# Altium PCB T_B 1.PcbDoc
Units mil, origin at the board's own origin, x right, y up, seen from the top; angles counter-clockwise.
Board outline 2834.65 x 1062.99 mil, 2 copper layers (Top Layer, Bottom Layer); 34 components, 22 nets, 84 pads, 27 vias.
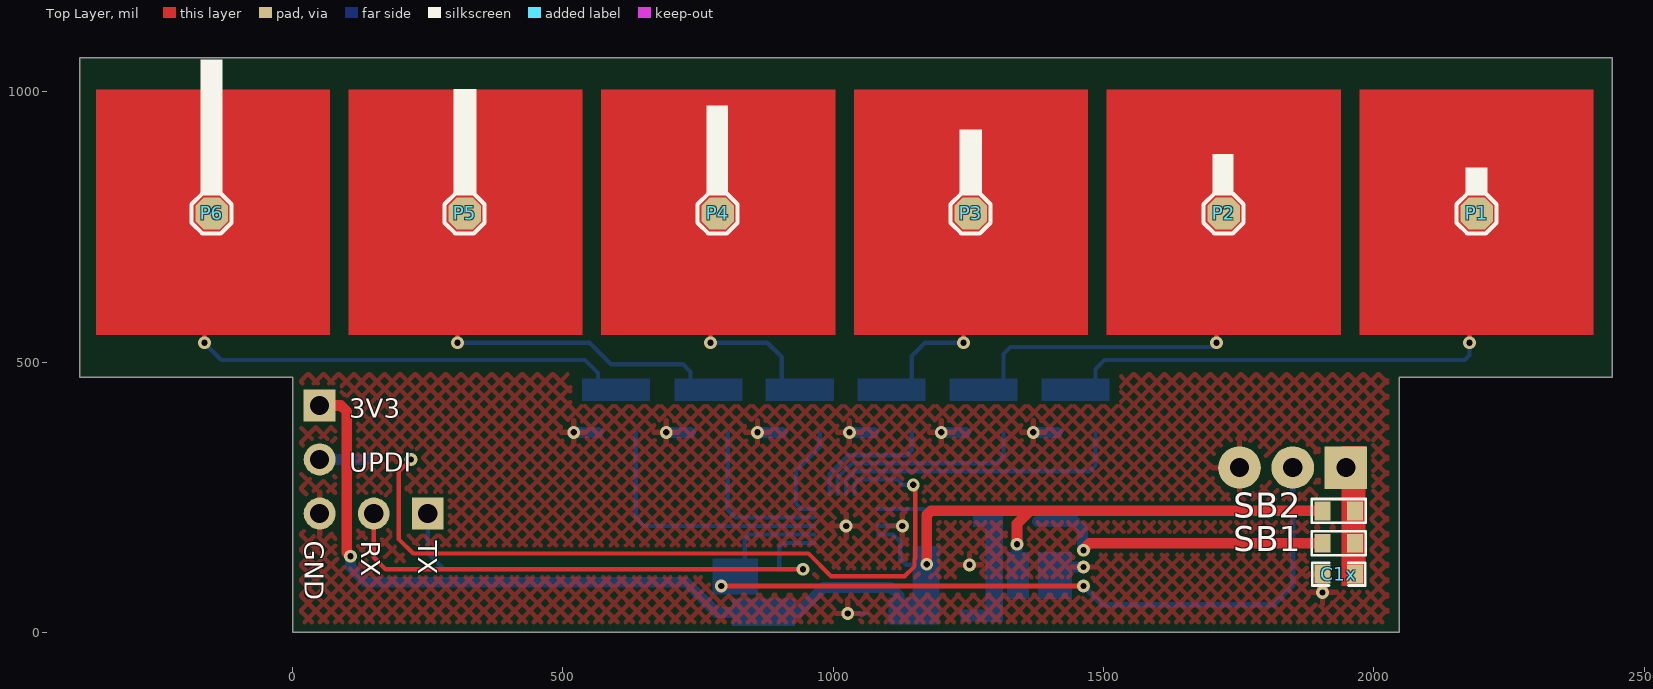
[diagram p0: Top Layer view]
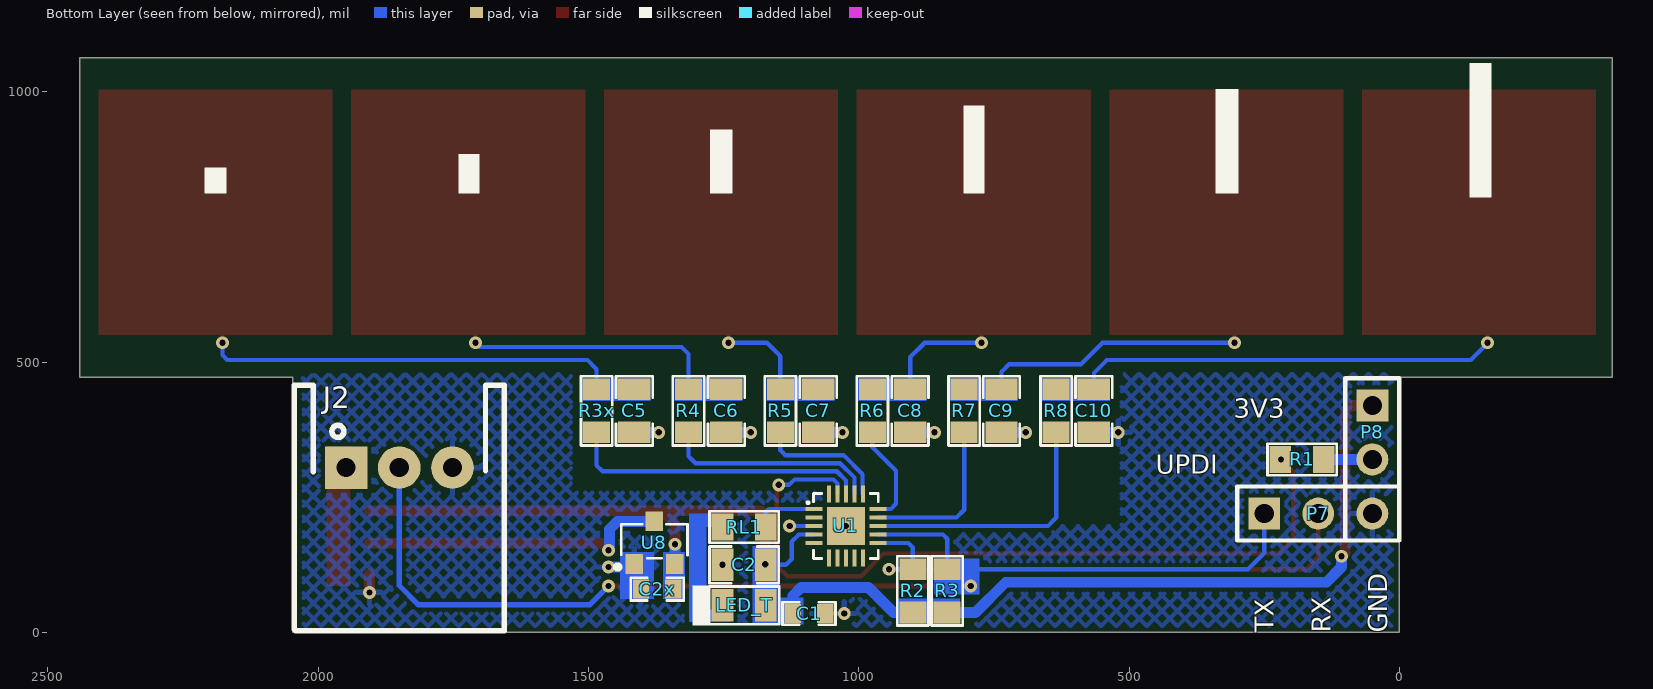
[diagram p1: Bottom Layer view, seen from below]
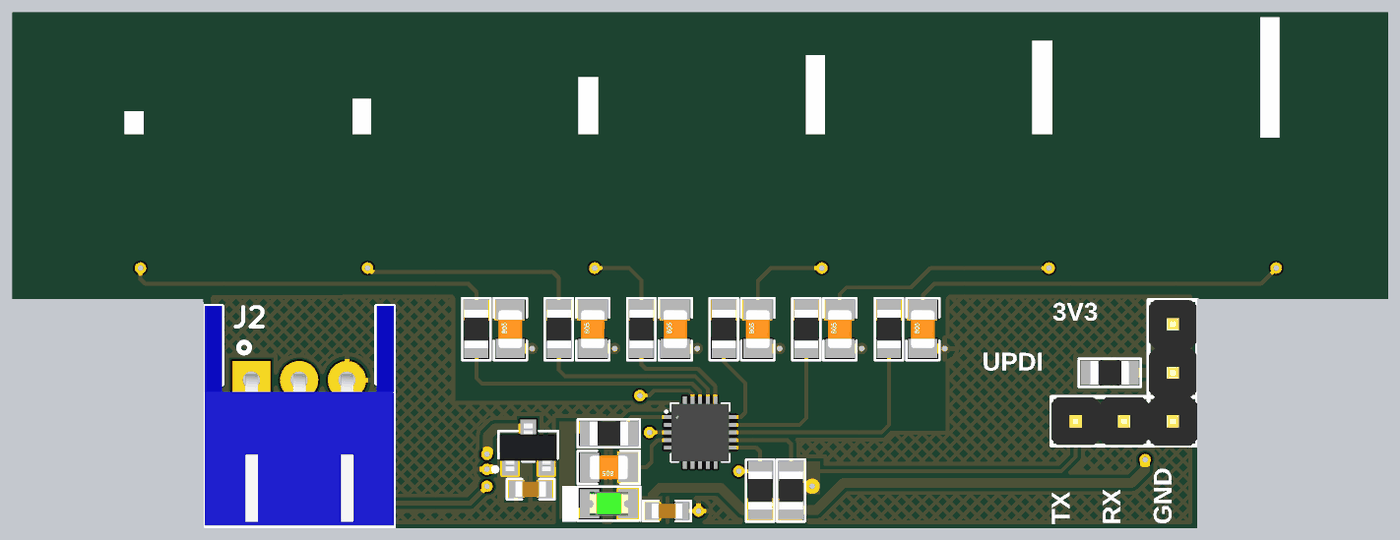
[diagram p2: 3D render of the assembled board from below, using the file's embedded part models]

## Layer stack, top to bottom
Top Solder: solder mask 0.4, Solder Resist, Dk 3.5
Top Layer: signal copper 1.4
Dielectric 1: dielectric 12.6, FR-4, Dk 4.8
Bottom Layer: signal copper 1.4
Bottom Solder: solder mask 0.4, Solder Resist, Dk 3.5

## Board outline
-393.7,472.44 0,472.44 0,0 2047.24,0 2047.24,472.44 2440.94,472.44 2440.94,1062.99 -393.7,1062.99

## Design rules (kind name [scope] priority, off if disabled: settings)
Clearance [All] p1: gap=7 ignorepadtopadclearanceinfootprint=FALSE
ComponentClearance [All] p1: gap=0 collisioncheckmode=3 verticalgap=0 showdistances=FALSE
MinimumSolderMaskSliver [All] p1: minsoldermaskwidth=0
PolygonConnect [All] p1: connectstyle=Relief reliefconductorwidth=10 reliefentries=4 polygonreliefangle="90 Angle" airgapwidth=10
RoutingVias [All] p1: holewidth=11.81 width=23.62 viastyle="Through Hole" minholewidth=11.81 minwidth=23.62 maxholewidth=11.81 maxwidth=50
SilkToSilkClearance [All] p1: silktosilkclearance=0
SilkToSolderMaskClearance [IsPad] p1: minsilkscreentomaskgap=0 clearancetoexposedcopper=TRUE
SolderMaskExpansion [All] p1: expansion=4
Width [All] p1: maxlimit=20 minlimit=8 preferedwidth=10
26 further rules are at their usual default settings.

## Classes and differential pairs
component class U_Controller_Section: C1 C2 LED_T R1 R2 R3 RL1 U1
component class U_Connector_Section: J2 P1 P2 P3 P4 P5 P6 P7 P8
component class U_Touch_Sensor_Section: C3 C5 C6 C7 C8 C9 C10 R3x R4 R5 R6 R7 R8
component class U_Power_Section: C1x C2x J1 SB1 SB2 U8

## Components (designator, comment, footprint, x,y, rotation, side; value= is the part's Value field where it differs from the comment)
C1 "1uF" Cap0603 1092,35 r180 bottom
C1x "1uF" Cap0603 1935,108 r180 top
C2 "0.1uF" Cap0805 1212,125 r0 bottom
C2x "1uF" Cap0603 1373,80 r0 bottom
C5 "22pF" Cap0805 1415,410 r90 bottom
C6 "22pF" Cap0805 1245,410 r90 bottom
C7 "22pF" Cap0805 1075,410 r90 bottom
C8 "22pF" Cap0805 905,410 r90 bottom
C9 "22pF" Cap0805 736,410 r90 bottom
C10 "22pF" Cap0805 565,410 r90 bottom
J2 "Main-Conn" S3B-XH-A-1(LF)(SN) 1948.43,305 r180 bottom locked
LED_T "150080GS75000" "LED 0805" 1212,50 r0 bottom
P1 "Test Point" "TEST POINT" 2190,775 r0 top
P2 "Test Point" "TEST POINT" 1722,775 r0 top
P3 "Test Point" "TEST POINT" 1254,775 r0 top
P4 "Test Point" "TEST POINT" 786,775 r0 top
P5 "Test Point" "TEST POINT" 318,775 r0 top
P6 "Test Point" "TEST POINT" -150,775 r0 top
P7 "Testing" HDR1X3#1 250,220 r180 bottom locked
P8 "Programming" HDR1X3#2 50,420 r270 bottom
R1 "5.6K" "RES 0805" 180,320 r180 bottom
R2 "5.6K" "RES 0805" 900,77 r270 bottom
R3 "5.6K" "RES 0805" 836.5,77 r270 bottom
R3x "1K" "RES 0805" 1485,410 r90 bottom
R4 "1K" "RES 0805" 1315,410 r90 bottom
R5 "1K" "RES 0805" 1145,410 r90 bottom
R6 "1K" "RES 0805" 975,410 r90 bottom
R7 "1K" "RES 0805" 805,410 r90 bottom
R8 "1K" "RES 0805" 635,410 r90 bottom
RL1 "1K" "RES 0805" 1212,195 r180 bottom
SB1 "Solder Bridge" "Solder Bridge" 1935,165 r180 top
SB2 "Solder Bridge" "Solder Bridge" 1935,225 r180 top
U1 "" 20-QFN 1023.75,196.94 r180 bottom
U8 "XC6206P332MR-G" sot-23 1378,166 r180 bottom

## Footprints (in the part's own frame and the unit in brackets; to place one, negate y for a bottom-side part, rotate by r counter-clockwise, add the part's x,y. Pads: shape width x height; smd on the part's side, far side on the other; paste and mask are expansions set on the pad)
20-QFN [mm] "IC MCU 8BIT 16KB FLASH 20VQFN"
  rect 0.8x0.2 smd: 1(-1.5,0.8) 2(-1.5,0.4) 3(-1.5,0) 4(-1.5,-0.4) 5(-1.5,-0.8) 11(1.5,-0.8) 12(1.5,-0.4) 13(1.5,0) 14(1.5,0.4) 15(1.5,0.8)
  rect 0.2x0.8 smd: 6(-0.8,-1.5) 7(-0.4,-1.5) 8(0,-1.5) 9(0.4,-1.5) 10(0.8,-1.5) 16(0.8,1.5) 17(0.4,1.5) 18(0,1.5) 19(-0.4,1.5) 20(-0.8,1.5)
  rect 1.8x1.8 smd: 21(0,0)
  silkscreen extent -1.83,-1.52 1.52,1.52, body extent -1.5,-1.5 1.5,1.5, height 0.59
Cap0603 [mil]
  rect 30x35 smd mask+2.36: 1(-30,0) 2(30,0)
  silkscreen extent -49,-21 49,21, body extent -32,-16 31,16, height 34
Cap0805 [mil] "SMD 0805"
  rect 40x60 smd mask+2.76: 1(-40,0) 2(40,0)
  silkscreen extent -64,-34 64,34, body extent -39,-25 39,25, height 30
HDR1X3#1 [mm] "Connector; Header; 3 Position"
  rect 1.5x1.5 hole 0.9: 1(0,0)
  round 1.5 hole 0.9: 2(2.54,0) 3(5.08,0)
  silkscreen extent -1.27,-1.27 6.35,1.27, body extent -1.27,-1.24 6.35,1.25, height 8.54
HDR1X3#2 [mm] "Connector; Header; 3 Position"
  rect 1.5x1.5 hole 0.9: 1(0,0)
  round 1.5 hole 0.9: 2(2.54,0)
  silkscreen extent -1.27,-1.27 6.35,1.27, body extent -1.27,-1.24 6.35,1.25, height 8.54
"LED 0805" [mil]
  rect 40x60 smd: 1(-39.99,0.01) 2(40.01,0.01)
  silkscreen extent -65,-37 96,37, body extent -40,-25 40,25, height 43
"RES 0805" [mil] "SMD 0805"
  rect 40x50 smd: 1(-40,0) 2(40,0)
  silkscreen extent -64,-29 64,29, body extent -39,-25 39,24, height 24
S3B-XH-A-1(LF)(SN) [mm] "XH Header Male Pin 0.098\"(2.50mm) 3 Through Hole,P=2.5mm Wire To Board / Wire To Wire Connector RoHS"
  rect 2x2 hole 0.9: 1(0,0)
  round 2 hole 0.9: 2(2.5,0) 3(5,0)
  silkscreen extent -2.44,-7.67 7.44,3.86, body extent -2.44,-7.62 7.46,3.88, height 6
"Solder Bridge" [mil] "Solder Bridge ON"
  rect 30x35 smd: 1(-30,0) 2(30,0)
  silkscreen extent -50,-22 50,22
sot-23 [mm]
  rect 0.82x0.92 smd: 1(-0.95,-1) 2(0.95,-1) 3(0,1)
  silkscreen extent -1.82,-1.23 1.56,0.86, body extent -1.5,-1.25 1.5,1.25, height 1.1
"TEST POINT" [mil]
  oct 60x60 smd: 1(0,0)
  silkscreen extent -37,-37 37,37

## Part data
C1 C1x C2x: library part CC0603KRX5R8BB105, "CAP CER 1UF 25V X5R 0603", Case/Package=0603, Case Code (Metric)=1608, Dielectric=X5R, Manufacturer=Yageo, Max Operating Temperature=85°C, Min Operating Temperature=-55°C, Package Quantity=1, Supplier Part Number 1=311-1445-1-ND, Tolerance=10%, Voltage Rating=25V, Capacitance=1uF, Case Code (Imperial)=0603, Category="Ceramic Capacitors", ComponentLink1Description=https://datasheet.ciiva.com/176/mlccorderingcode-176785.pdf?src-supplier=Digi-Key, ComponentLink1URL=https://datasheet.ciiva.com/176/mlccorderingcode-176785.pdf?src-supplier=Digi-Key, ComponentLink2Description=https://datasheet.ciiva.com/176/mlccorderingcode-176786.pdf?src-supplier=Digi-Key, ComponentLink2URL=https://datasheet.ciiva.com/176/mlccorderingcode-176786.pdf?src-supplier=Digi-Key, ComponentLink3Description=https://datasheet.ciiva.com/176/mlccorderingcode-176787.pdf?src-supplier=Digi-Key, ComponentLink3URL=https://datasheet.ciiva.com/176/mlccorderingcode-176787.pdf?src-supplier=Digi-Key, ComponentLink4Description=https://datasheet.ciiva.com/17436/upy-gphc-x5r-4v-to-50v-12-17436952.pdf?src-supplier=Avnet+Europe, ComponentLink4URL=https://datasheet.ciiva.com/17436/upy-gphc-x5r-4v-to-50v-12-17436952.pdf?src-supplier=Avnet+Europe, ComponentLink5Description=https://datasheet.ciiva.com/7978/1525783-7978171.pdf?src-supplier=Element14, ComponentLink5URL=https://datasheet.ciiva.com/7978/1525783-7978171.pdf?src-supplier=Element14, ComponentLink6Description=https://datasheet.ciiva.com/11586/upy-gphc-x5r-4v-to-50v-12-11586318.pdf?src-supplier=Avnet, ComponentLink6URL=https://datasheet.ciiva.com/11586/upy-gphc-x5r-4v-to-50v-12-11586318.pdf?src-supplier=Avnet, Construction=Flat, Depth=0.8mm, Halogen Free="Halogen Free", Height=0.8mm, Lead Free="Lead Free", Length=1.6mm, Manufacturer Part Number=CC0603KRX5R8BB105, Mount="Surface Mount", Number of Pins=2, Packaging="Tape and Reel", Pricing 1="1=0.12000, 10=0.08400, 50=0.04760, 100=0.03940, 500=0.02764, 1000=0.02288 (USD)", Radiation Hardening=No, REACH SVHC="No SVHC", RoHS=Yes, RoHS Compliant=Yes, Series=CC, Stock 1=919939, Supplier 1=Digi-Key, Termination=SMD/SMT, Thickness=0.035inch, Voltage Rating (DC)=25V, Width=0.031inch
C2: library part 0805B104K500CT, "CAP CER 0.1UF 50V X7R 0805", Capacitance=100nF, Case/Package=0805, Case Code (Metric)=2012, Dielectric=X7R, Manufacturer="Walsin Technologies", Max Operating Temperature=125°C, Min Operating Temperature=-55°C, Supplier Part Number 1=1292-1647-1-ND, Tolerance=10%, Voltage=50V, Case Code (Imperial)=0805, Category="Ceramic Capacitors", ComponentLink1Description=http://www.farnell.com/datasheets/2340522.pdf?src-supplier=Farnell, ComponentLink1URL=http://www.farnell.com/datasheets/2340522.pdf?src-supplier=Farnell, ComponentLink2Description=http://components.arrow.com/part/dataview/0323_00650840?src-supplier=Arrow+Europe, ComponentLink2URL=http://components.arrow.com/part/dataview/0323_00650840?src-supplier=Arrow+Europe, ComponentLink3Description=https://www.verical.com/server-webapp/html/getDatasheet?partID=414849&src-supplier=Verical, ComponentLink3URL=https://www.verical.com/server-webapp/html/getDatasheet?partID=414849&src-supplier=Verical, ComponentLink4Description=http://www.farnell.com/datasheets/2340522.pdf?src-supplier=Element14, ComponentLink4URL=http://www.farnell.com/datasheets/2340522.pdf?src-supplier=Element14, ComponentLink5Description=http://www.passivecomponent.com/wp-content/uploads/2018/10/MLCC.pdf?src-supplier=Digi-Key, ComponentLink5URL=http://www.passivecomponent.com/wp-content/uploads/2018/10/MLCC.pdf?src-supplier=Digi-Key, ComponentLink6Description=http://www.passivecomponent.com/indexsea/0805B104K500CT-IB.pdf?src-supplier=Digi-Key, ComponentLink6URL=http://www.passivecomponent.com/indexsea/0805B104K500CT-IB.pdf?src-supplier=Digi-Key, ComponentLink7Description=http://www.farnell.com/datasheets/2340522.pdf?src-supplier=Newark, ComponentLink7URL=http://www.farnell.com/datasheets/2340522.pdf?src-supplier=Newark, Depth=1.25mm, Lead Free="Lead Free", Length=2mm, Manufacturer Part Number=0805B104K500CT, Packaging="Tape and Reel", Pricing 1="1=0.12000, 10=0.08600, 50=0.04900, 100=0.04050, 500=0.02842, 1000=0.02352 (USD)", Radiation Hardening=No, REACH SVHC=Unknown, RoHS=Yes, Stock 1=1274242, Supplier 1=Digi-Key, Voltage Rating=50V, Voltage Rating (DC)=50V
C5 C6 C7 C8 C9 C10: library part AC0805JRNPO9BN220, "CAP CER 22PF 50V NPO 0805", Manufacturer=Yageo, Supplier Part Number 1=311-3136-1-ND, Category="Ceramic Capacitors", Manufacturer Part Number=AC0805JRNPO9BN220, Pricing 1="1=0.18000, 10=0.12900, 50=0.07320, 100=0.06060, 500=0.04250, 1000=0.03519 (USD)", RoHS=Yes, RoHS Compliant=Yes, Stock 1=633, Supplier 1=Digi-Key
J2: library part S3B-XH-A-1(LF)(SN), "CONN HEADER XH SIDE 3POS 2.5MM", Color=Natural, Manufacturer=JST, Package Quantity=1000, Supplier Part Number 1=455-2954-ND, Category=Connectors, ComponentLink1Description=https://datasheet.ciiva.com/725/exh-725857.pdf?src-supplier=Digi-Key, ComponentLink1URL=https://datasheet.ciiva.com/725/exh-725857.pdf?src-supplier=Digi-Key, ComponentLink2Description=https://datasheet.ciiva.com/16484/ejq-16484618.pdf?src-supplier=Future+Electronics, ComponentLink2URL=https://datasheet.ciiva.com/16484/ejq-16484618.pdf?src-supplier=Future+Electronics, Connector Type="Male Pin", Contact Plating=Tin, Fastening Type=Detent, Lead Free="Lead Free", Manufacturer Part Number=S3B-XH-A-1(LF)(SN), Mount="Through Hole", Number of Positions=3, Number of Rows=1, Packaging=Bulk, Pitch=0.098inch, Pricing 1="1=0.22000, 10=0.20900, 100=0.14520, 500=0.12282, 1000=0.10049, 5000=0.08933, 10000=0.08095 (USD)", RoHS=Yes, Supplier 1=Digi-Key, Termination=Press-Fit
LED_T: "LED GREEN CLEAR 0805 SMD", Case/Package=0805, Case Code (Metric)=2012, Color=Green, Forward Current=30mA, Forward Voltage=3.2V, Manufacturer="Wurth Electronics", Max Operating Temperature=85°C, Min Operating Temperature=-40°C, Package Quantity=4000, Supplier Part Number 1=732-4983-1-ND, Test Current=20mA, Case Code (Imperial)=0805, Category=LEDs, ComponentLink1Description=https://datasheet.ciiva.com/29563/150080gs75000-29563008.pdf?src-supplier=Digi-Key, ComponentLink1URL=https://datasheet.ciiva.com/29563/150080gs75000-29563008.pdf?src-supplier=Digi-Key, ComponentLink2Description=https://datasheet.ciiva.com/29279/759434-da-01-en-chipled-0805-w-kl-gruen-150080gs75000-29279039.pdf?src-supplier=Conrad, ComponentLink2URL=https://datasheet.ciiva.com/29279/759434-da-01-en-chipled-0805-w-kl-gruen-150080gs75000-29279039.pdf?src-supplier=Conrad, Dominant Wavelength=520nm, Height=0.7mm, Length=2mm, Lens Style=Clear,Rectangular, Luminous Intensity=450mcd, Manufacturer Part Number=150080GS75000, Mount="Surface Mount", Packaging="Cut Tape", Pricing 1="1=0.18000, 50=0.16500, 100=0.14200, 500=0.12300 (USD)", REACH SVHC=Unknown, RoHS=Yes, RoHS Compliant=Yes, Stock 1=96823, Supplier 1=Digi-Key, Viewing Angle=140°, Wavelength=520nm, Width=1.25mm
P1 P2 P3 P4 P5 P6: library part "TEST POINT", "Test Point ON"
P7 P8: library part "Header 3", "CONN HEADER VERT 3POS 2.54MM", Color=Black, Manufacturer="Wurth Electronics", Manufacturer Part Number=61300311121, Supplier Part Number 1=732-5316-ND, ComponentLink1Description=http://www.farnell.com/cad/1737268.pdf?src-supplier=Element14, ComponentLink1URL=http://www.farnell.com/cad/1737268.pdf?src-supplier=Element14, ComponentLink2Description=https://katalog.we-online.de/em/datasheet/6130xx11121.pdf?src-supplier=Digi-Key, ComponentLink2URL=https://katalog.we-online.de/em/datasheet/6130xx11121.pdf?src-supplier=Digi-Key, Connector Type="Male Pin", Contact Material=Copper, Contact Mating Length=0.236inch, Contact Plating=Gold, Gender=Male, Lead Free="Lead Free", Mount="Through Hole", Number of Contacts=3, Number of Positions=3, Number of Rows=1, Packaging=Bulk, Pitch=0.1inch, Pricing 1="1=0.13, 10=0.106, 25=0.088, 50=0.074, 100=0.067, 1000=0.061 (USD)", REACH SVHC=Unknown, Stock 1=81286, Supplier 1=Digi-Key, Termination=Solder
R1 R2 R3: library part ERJ6ENF5601V, "RES SMD 5.6K Ohm 1% 0805", Case/Package=0805, Case Code (Metric)=2012, Manufacturer=Panasonic, Manufacturer Part Number=ERJ-6ENF5601V, Max Operating Temperature=155°C, Max Power Dissipation=125mW, Min Operating Temperature=-55°C, Package Quantity=1, Resistance=5.6kR, Resistance Tolerance=1%, Resistor Type="Thick Film", Supplier Part Number 1=P5.60KCCT-ND, Temperature Coefficient=100ppm/°C, Voltage Rating=150V, Case Code (Imperial)=0805, Category="Chip SMD Resistors", ComponentLink1Description=https://datasheet.ciiva.com/11821/0900766b80f80784-11821697.pdf?src-supplier=RSComponents, ComponentLink1URL=https://datasheet.ciiva.com/11821/0900766b80f80784-11821697.pdf?src-supplier=RSComponents, ComponentLink2Description=https://datasheet.ciiva.com/9195/aoa0000ce2-9195464.pdf?src-supplier=Avnet, ComponentLink2URL=https://datasheet.ciiva.com/9195/aoa0000ce2-9195464.pdf?src-supplier=Avnet, ComponentLink3Description=https://datasheet.ciiva.com/6138/426256-6138793.pdf?src-supplier=Farnell, ComponentLink3URL=https://datasheet.ciiva.com/6138/426256-6138793.pdf?src-supplier=Farnell, ComponentLink4Description=https://datasheet.ciiva.com/30195/aoa0000ce2-30195103.pdf?src-supplier=Onlinecomponents.com, ComponentLink4URL=https://datasheet.ciiva.com/30195/aoa0000ce2-30195103.pdf?src-supplier=Onlinecomponents.com, ComponentLink5Description=https://datasheet.ciiva.com/17212/aoa0000ce2-17212901.pdf?src-supplier=Avnet+Europe, ComponentLink5URL=https://datasheet.ciiva.com/17212/aoa0000ce2-17212901.pdf?src-supplier=Avnet+Europe, ComponentLink6Description=https://datasheet.ciiva.com/22737/426256-22737287.pdf?src-supplier=Element14, ComponentLink6URL=https://datasheet.ciiva.com/22737/426256-22737287.pdf?src-supplier=Element14, ComponentLink7Description=https://datasheet.ciiva.com/46420/1678782-46420327.pdf?src-supplier=Element14, ComponentLink7URL=https://datasheet.ciiva.com/46420/1678782-46420327.pdf?src-supplier=Element14, ComponentLink8Description=https://datasheet.ciiva.com/16784/70260748-16784840.pdf?src-supplier=Allied+Electronics, ComponentLink8URL=https://datasheet.ciiva.com/16784/70260748-16784840.pdf?src-supplier=Allied+Electronics, ComponentLink9Description=https://datasheet.ciiva.com/16771/70260748-16771098.pdf?src-supplier=Allied+Electronics, ComponentLink9URL=https://datasheet.ciiva.com/16771/70260748-16771098.pdf?src-supplier=Allied+Electronics, ComponentLink10Description=https://datasheet.ciiva.com/16512/aoa0000ce2-16512011.pdf?src-supplier=Avnet+Asia, ComponentLink10URL=https://datasheet.ciiva.com/16512/aoa0000ce2-16512011.pdf?src-supplier=Avnet+Asia, ComponentLink11Description=https://datasheet.ciiva.com/22673/1678782-22673707.pdf?src-supplier=Element14, ComponentLink11URL=https://datasheet.ciiva.com/22673/1678782-22673707.pdf?src-supplier=Element14, ComponentLink12Description=https://datasheet.ciiva.com/24024/aoa0000ce2-24024829.pdf?src-supplier=Mouser, ComponentLink12URL=https://datasheet.ciiva.com/24024/aoa0000ce2-24024829.pdf?src-supplier=Mouser, Construction=Rectangular, Contact Plating=Tin, Depth=1.25mm, Features="Automotive AEC-Q200", Height=0.6mm, Lead Free="Lead Free", Length=2mm, Military Standard=Not, Mount="Surface Mount", Number of Pins=2, Number of Terminations=2, Packaging="Tape and Reel", Power Rating=125mW, Pricing 1="1=0.10000, 10=0.07500, 100=0.02880, 1000=0.01265, 2500=0.01092 (USD)", Radiation Hardening=No, REACH SVHC="No SVHC", RoHS=Yes, RoHS Compliant=Yes, Series=ERJ, Stock 1=4806, Supplier 1=Digi-Key, Technology="THICK FILM", Termination=SMD/SMT, Tolerance=1%, Voltage Rating (DC)=150V, Width=0.049inch
R3x R4 R5 R6 R7 R8 RL1: library part CRCW08051K00JNEB, "RES SMD 1K OHM 5% 1/8W 0805", Case/Package=0805, Case Code (Metric)=2012, Manufacturer="Vishay Dale", Max Operating Temperature=155°C, Max Power Dissipation=125mW, Min Operating Temperature=-55°C, Package Quantity=10000, Resistance=1kR, Resistor Type="Thick Film", Supplier Part Number 1=541-CRCW08051K00JNEBCT-ND, Temperature Coefficient=200ppm/°C, Tolerance=5%, Voltage Rating=150V, Case Code (Imperial)=0805, Category="Chip SMD Resistors", ComponentLink1Description=https://datasheet.ciiva.com/5548/dcrcwe3-109170-5548326.pdf?src-supplier=Mouser, ComponentLink1URL=https://datasheet.ciiva.com/5548/dcrcwe3-109170-5548326.pdf?src-supplier=Mouser, ComponentLink2Description=https://datasheet.ciiva.com/28621/1747939-28621434.pdf?src-supplier=Element14, ComponentLink2URL=https://datasheet.ciiva.com/28621/1747939-28621434.pdf?src-supplier=Element14, Contact Plating=Tin, Features="Automotive AEC-Q200", Height=0.02inch, Lead Free="Lead Free", Length=0.079inch, Manufacturer Part Number=CRCW08051K00JNEB, Number of Pins=2, Number of Terminations=2, Packaging="Tape and Reel", Power Rating=125mW, Pricing 1="1=0.10000, 10=0.05000, 100=0.02040, 1000=0.00914, 2500=0.00794, 5000=0.00656 (USD)", Radiation Hardening=No, REACH SVHC=Unknown, RoHS=Yes, Stock 1=4389, Supplier 1=Digi-Key, Termination=SMD/SMT, Voltage Rating (DC)=150V, Weight=0.000194oz, Width=0.049inch
SB1 SB2: "Solder Bridge ON"
U1: library part ATTINY1616-MNR, "IC MCU 8BIT 16KB FLASH 20VQFN", Case/Package=VQFN, Frequency=20MHz, Manufacturer=Microchip, Max Operating Temperature=105°C, Min Operating Temperature=-40°C, Supplier Part Number 1=ATTINY1616-MNRCT-ND, Category=Microcontrollers, ComponentLink1Description=http://www.microchip.com/mymicrochip/filehandler.aspx?ddocname=en606269&src-supplier=Digi-Key, ComponentLink1URL=http://www.microchip.com/mymicrochip/filehandler.aspx?ddocname=en606269&src-supplier=Digi-Key, Core Architecture=AVR, Interface=I2C,SPI,IrDA,UART,USART, Manufacturer Part Number=ATTINY1616-MNR, Memory Size=16KB, Memory Type=FLASH, Number of I/Os=18, Oscillator Type=Internal, Packaging="Cut Tape", Peripherals="Brown-out Detect/Reset,POR,PWM,WDT", Pricing 1="1=0.75000, 25=0.69000, 100=0.62000 (USD)", RoHS=No, Stock 1=3963, Supplier 1=Digi-Key
U8: "IC REG LINEAR 3.3V 200MA SOT23", Case/Package=TO-236-3, Dropout Voltage=680mV, Manufacturer=Torex, Max Input Voltage=6V, Max Operating Temperature=85°C, Max Supply Current=3uA, Min Operating Temperature=-40°C, Min Output Voltage=3.3V, Output Current=200mA, Category="Voltage Regulators - Linear", ComponentLink1Description=https://www.torexsemi.com/file/xc6206/XC6206.pdf?src-supplier=Digi-Key, ComponentLink1URL=https://www.torexsemi.com/file/xc6206/XC6206.pdf?src-supplier=Digi-Key, Manufacturer Part Number=XC6206P332MR-G, Mount="Surface Mount", Number of Regulators=1, Output Configuration=Positive, Output Type=Fixed, Pricing 1="3000=0.23146, 6000=0.22820, 12000=0.22168, 18000=0.21679, 24000=0.20864, 30000=0.20375, 300000=0.19886 (USD)", Quiescent Current=3uA, RoHS=Yes, RoHS Compliant=Yes, Supplier 1=Avnet, Supplier Part Number 1=XC6206P332MR-G

## Via types
v1: diameter 23.62, hole 11.81, Top Layer to Bottom Layer, 21 vias
v2: diameter 23.62, hole 11.81, Top Layer to Bottom Layer, tented top, 6 vias

## Nets (pads, with @x,y where several pads share a name; then routed paths per layer and width w, separated by ;. In a path a pad name is that pad's centre, name@x,y a point inside that pad or via, vN(x,y) a via of type N, cw(c..) or ccw(c..) an arc to the next point about the centre after c; other vN are vias at no path point)
3V3: C1.1 C2.1 C2x.1 LED_T.1 P8.1 R2.2 R3.2 SB2.2 U1.4 U8.2 | length 2458.9
  Top Layer w20: P8.1 89,420 100,409 100,148 v1(107,141) ; v1(1173,126) 1173,217 1181,225 1364,225 ; v1(1340,163) 1340,201 1364,225 ; SB2.2 1364,225
  Bottom Layer w8: U1.4 1110.8,181.2 1124,168 1124,136 1135,125 C2.1
  Bottom Layer w20: v1(107,141) 107,121 135,93 728,93 784,37 R3.2 ; R2.2 936,37 982,83 1107,83 1122,68 C1.1 C1.1@1123,36 ; C2.1 v1(1173,126) ; v1(1340,163) 1340,127.23 U8.2
#UPDI: P8.2 R1.2 | length 92.1
  Bottom Layer w20: P8.2 135,320 R1.2@140,325
GND: C1.2 C1x.2 C2.2 C2x.2 C5.1 C6.1 C7.1 C8.1 C9.1 C10.1 J2.3 P7.3 U1.3 U1.21 U8.1 | length 439.2
  Top Layer w20: v1(1905,74) C1x.2
  Bottom Layer w8: v1@1020,35 v1(1027,35) C1.2 ; U1.3 1127.94,196.94 v1(1128,197)
  Bottom Layer w20: v2(520,370) C10.1 ; v2(691,370) C9.1 ; v2(860,370) C8.1 ; v2(1030,370) C7.1 ; v2(1200,370) C6.1 ; v2(1370,370) C5.1 ; U8.1 1421.03,121 v1@1461,121
  other v1: 1463,121 1252,125 1023.75,196.94
Key_1: R3x.1 U1.18 | length 558.8
  Bottom Layer w8: U1.18 1023.75,280.96 1040.79,298 1474,298 1485,309 R3x.1
Key_2: R4.1 U1.17 | length 397.8
  Bottom Layer w8: U1.17 1008,286.42 1034.58,313 1302,313 1315,326 R4.1
Key_3: R5.1 U1.16 | length 240.8
  Bottom Layer w8: U1.16 993,256 993,292.64 1028.36,328 1136,328 1145,337 R5.1
Key_4: R6.1 U1.15 | length 187.9
  Bottom Layer w8: U1.15 940.56,228.44 931,238 931,299 975,343 R6.1
Key_5: R7.1 U1.14 | length 308.6
  Bottom Layer w8: R7.1 805,227 819.31,212.69 U1.14
Key_6: R8.1 U1.13 | length 493.9
  Bottom Layer w8: R8.1 635,212 650.06,196.94 U1.13
LED_T: RL1.2 U1.1 | length 119.5
  Bottom Layer w8: U1.1 1166.56,228.44 1172,223 RL1.2
NetLED_T_2: LED_T.2 RL1.1
NetSB1_2: SB1.2 U8.3 | length 577.3
  Top Layer w20: v1@1461,152 1474,165 SB1.2
  Bottom Layer w20: U8.3 1446.63,205.37 1461,191 v1@1461,152
  other v1: 1463,152
RX: P7.2 R2.1 U1.11 | length 1036.3
  Top Layer w8: P7.2 150,139 172,117 v1(944,117)
  Bottom Layer w8: v1(944,117) R2.1 900,157 908.45,165.45 U1.11
TOUCH_1: C5.2 P1.1 R3x.2 | length 988.8
  Top Layer w8: v1(2177,536) P1.1@2177,762
  Bottom Layer w8: R3x.2 1485,487 1502,504 2168,504 2177,513 v1(2177,536)
TOUCH_2: C6.2 P2.1 R4.2 | length 693.7
  Top Layer w8: v1(1709,536) P2.1@1709,762
  Bottom Layer w8: R4.2 1315,515 1328,528 1701,528 v1(1709,536)
TOUCH_3: C7.2 P3.1 R5.2 | length 393.4
  Top Layer w8: v1(1241,536) P3.1@1241,762
  Bottom Layer w8: R5.2 1145,511 1170,536 v1(1241,536)
TOUCH_4: C8.2 P4.1 R6.2 | length 428.2
  Top Layer w8: v1(773,536) P4.1@773,762
  Bottom Layer w8: v1(773,536) 878,536 905,509 C8.2
TOUCH_5: C9.2 P5.1 R7.2 | length 711.4
  Top Layer w8: v1(305,536) P5.1@305,762
  Bottom Layer w8: v1(305,536) 549,536 589,496 722,496 736,482 C9.2
TOUCH_6: C10.2 P6.1 R8.2 | length 1026.2
  Top Layer w8: v1(-163,536) -163,762 P6.1
  Bottom Layer w8: v1(-163,536) -163,535 -132,504 541,504 565,480 C10.2
TX: J2.2 P7.1 R3.1 U1.12 | length 2164.2
  Top Layer w10: v1(793,86) v1(1463,86)
  Bottom Layer w8: P7.1 250,147 280,117 R3.1 836.5,173.5 844.2,181.2 U1.12
  Bottom Layer w10: v1(1463,86) 1498,51 1814,51 1850,87 J2.2
UPDI: R1.1 U1.19 | length 1435.3
  Top Layer w8: v1(219,320) 196,297 196,173 223,146 954,146 996,104 1132,104 1150.19,122.19 1150.19,135.45 1152,137.26 1152,269 v1(1148,273)
  Bottom Layer w8: U1.19 1039.5,275.49 1047,283 1119,283 1129,273 v1(1148,273)
VIN: C1x.1 J2.1 SB1.1 SB2.1
pads on no net: U1.2 U1.5 U1.6 U1.7 U1.8 U1.9 U1.10 U1.20

## Polygon pours and split planes (outlines as drawn)
GND on Top Layer (hatched 45Degree grid 20 track 8, pour order 0): 16,19 2025,19 2025,477.46 1537.44,477.46 ccw(c1537.44,472.44) 1532.43,472.44 1532.43,419 513.57,419 513.57,471.44 ccw(c508.58,471.45) 512.09,475 511.11,475.99 ccw(c507.58,472.5) 507.56,477.46 16,477.46
GND on Bottom Layer (hatched 45Degree grid 20 track 8, remove dead copper, pour order 1): 14,12 2027,12 2027,467.43 ccw(c2022.72,471.71) 2027,475.99 1537.44,477.46 ccw(c1537.44,472.44) 1532.43,472.44 1532.43,258.46 1064.44,258.46 ccw(c1064.44,253.44) 1059.43,253.44 1059.43,196.46 513.57,196.46 513.57,471.44 ccw(c508.58,471.45) 512.09,475 511.11,475.99 ccw(c507.58,472.49) 507.56,477.46 14,477.46

## Other copper
Top Layer:
  rectangle net VIN: 1940,86 1985,345
  region net TOUCH_1: 2406.26,1003.94 1973.19,1003.94 1973.19,550 2406.26,550
  region net TOUCH_2: 1938.82,1003.94 1505.75,1003.94 1505.75,550 1938.82,550
  region net TOUCH_3: 1471.38,1003.94 1038.31,1003.94 1038.31,550 1471.38,550
  region net TOUCH_4: 1003.94,1003.94 570.87,1003.94 570.87,550 1003.94,550
  region net TOUCH_5: 536.5,1003.94 103.43,1003.94 103.43,550 536.5,550
  rectangle net TOUCH_6: -364.02,550 69.06,1003.94
Bottom Layer:
  rectangle net TX: 777,70 861,137
  rectangle net TOUCH_1: 1385,428 1511,470
  rectangle net TOUCH_2: 1215,428 1341,470
  rectangle net TOUCH_3: 1045,428 1171,470
  rectangle net TOUCH_4: 875,428 1001,470
  rectangle net TOUCH_5: 706,428 832,470
  rectangle net TOUCH_6: 535,428 661,470
  region net 3V3: 929,12 929,63 813,63 813,12
  rectangle net GND: 1379,62 1442,149
  rectangle net 3V3: 1321,62 1362,149
  rectangle net NetLED_T_2: 1235,20 1314,42
  rectangle net NetLED_T_2: 1282,19 1314,220
  rectangle net NetLED_T_2: 1259,195 1314,220
  rectangle net 3V3: 1102,15 1197,65
  rectangle net 3V3: 1147,15 1197,160

## Silkscreen, mask and mechanical layers (free items; w line width, h text height)
Top Overlay:
  rectangle: -170,812 -130,1060
  rectangle: 298,812 340,1005
  rectangle: 766,812 805,975
  rectangle: 1234,812 1275,930
  rectangle: 1702,812 1740,885
  rectangle: 2170,812 2210,860
  text "3V3" at 105,385 h60
  text "UPDI" at 105,285 h60
  text "GND" at 10,170 h60 r270
  text "RX" at 115,170 h60 r270
  text "TX" at 220,170 h60 r270
Bottom Overlay:
  rectangle: 2170,812 2210,860
  rectangle: 1702,812 1740,885
  rectangle: 1234,812 1275,930
  rectangle: 767,812 806,975
  rectangle: 298,812 340,1005
  rectangle: -170,805 -130,1053
  text "3V3" at 306,385 h60
  text "UPDI" at 451,282 h60
  text "GND" at 10,-1 h60 r270
  text "RX" at 115,-1 h60 r270
  text "TX" at 220,-1 h60 r270
Mechanical 1:
  lines w10: 0,472.44 2047.56,472.44 ; 1023.62,0 1023.62,472.44
Mechanical 2:
  lines w10: -78.74,1062.99 -393.7,1062.99 ; 2047.24,0 0,0 ; 2047.56,0.32 2047.56,472.44 2440.94,472.44 2440.94,1062.99 -393.7,1062.99 ; -393.7,1062.99 -393.7,472.44 0,472.44 ; 0,0 0,472.44 ; 0,0 0,472.44

## Dimensions
2047.56,472.44 to 2440.94,472.44 on Mechanical 1
0,472.44 to 0,0 on Mechanical 1
-393.7,1062.99 to -393.7,472.44 on Mechanical 1
-393.7,1062.99 to 2440.94,1062.99 on Mechanical 1
0,0 to 2047.56,0.32 on Mechanical 1